# Altium PCB TempMonitorPCB.PcbDoc
Units mm, origin at the board's own origin, x right, y up, seen from the top; angles counter-clockwise.
Board outline 21.08 x 98.31 mm, 2 copper layers (Top Layer, Bottom Layer); 8 components, 9 nets, 45 pads, 2 vias.
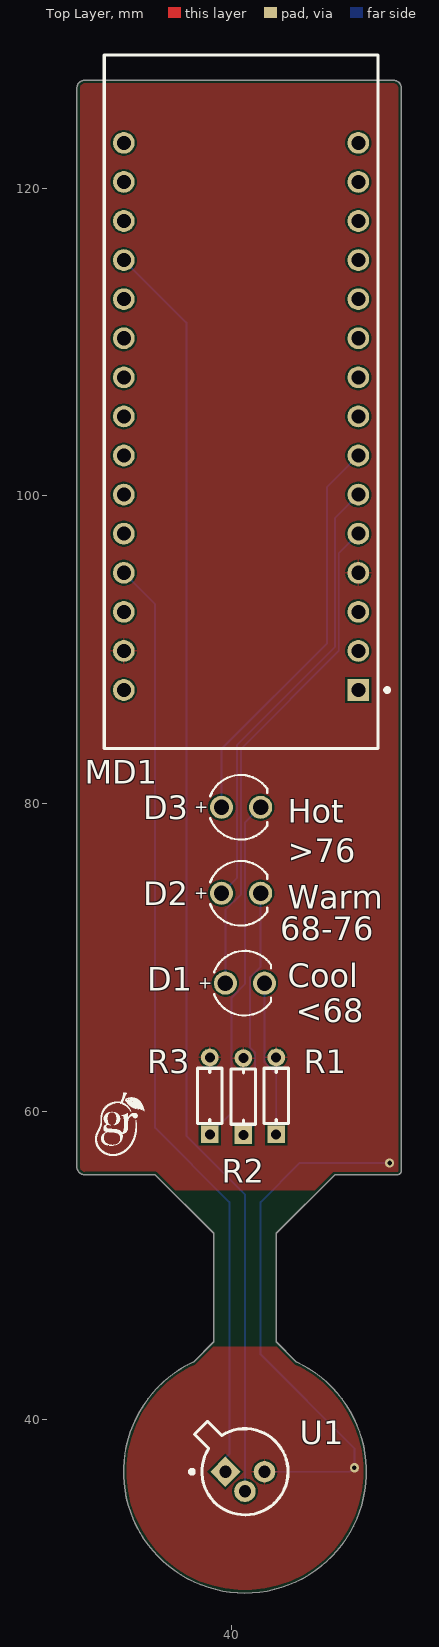
[diagram p0: Top Layer view]
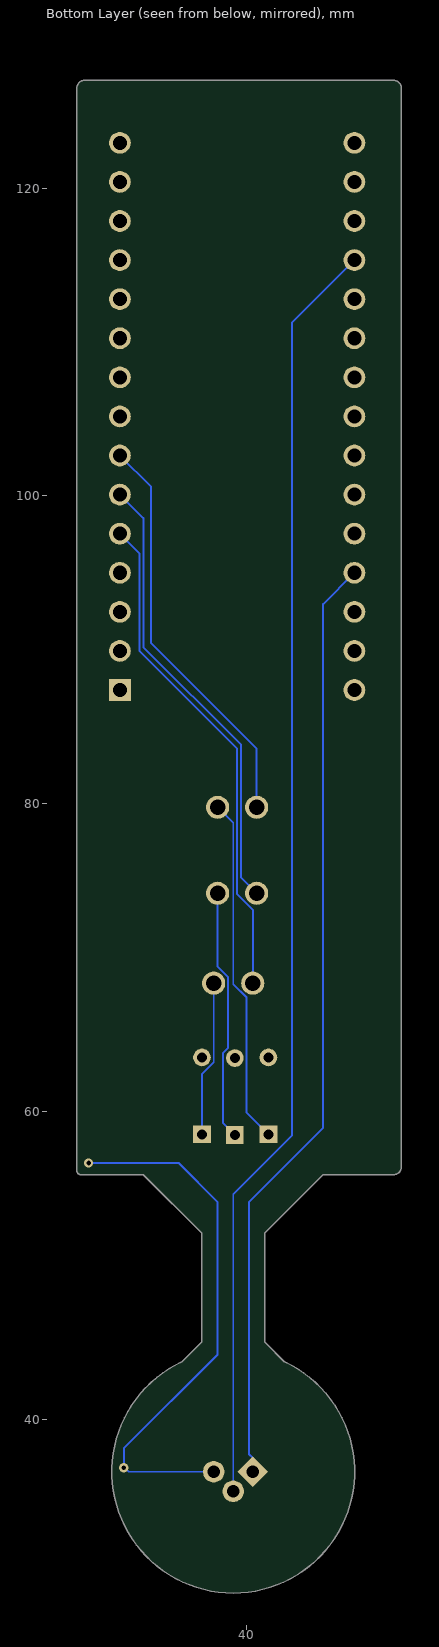
[diagram p1: Bottom Layer view, seen from below]

## Layer stack, top to bottom
Top Solder: solder mask 0.0102, Solder Resist, Dk 3.5
Top Layer: signal copper 0.0356
Dielectric 1: dielectric 0.32, FR-4, Dk 4.8
Bottom Layer: signal copper 0.0356
Bottom Solder: solder mask 0.0102, Solder Resist, Dk 3.5

## Board outline
37.573,43.729 38.802,44.958 38.862,45.018 38.862,52.07 35.052,55.88 30.48,55.88 cw(c30.48,56.388) 29.972,56.388 29.972,126.492 cw(c30.48,126.492) 30.48,127 50.546,127 cw(c50.546,126.492) 51.054,126.492 51.054,56.134 cw(c50.8,56.134) 50.8,55.88 46.736,55.88 42.926,52.07 42.926,45.018 44.215,43.729 cw(c40.894,36.576)

## Design rules (kind name [scope] priority, off if disabled: settings)
BoardOutlineClearance [All] p1: gap=0.2 ignorepadtopadclearanceinfootprint=FALSE
Clearance [All] p1: gap=0.127 ignorepadtopadclearanceinfootprint=FALSE except(0.25: Arc-Hole Track-Hole SMDPad-Hole THPad-Hole Via-Hole Fill-Hole Poly-Hole Region-Hole Text-Hole)
ComponentClearance [All] p1: gap=0.127 collisioncheckmode=3 verticalgap=0.127 showdistances=TRUE
DiffPairsRouting [All] p1: maxlimit=0.254 minlimit=0.127 mostfreqgap=0.127 toplayer_minwidth=0.127 toplayer_maxwidth=25.4 toplayer_prefwidth=0.127 bottomlayer_minwidth=0.127 bottomlayer_maxwidth=25.4 bottomlayer_prefwidth=0.127 maxuncoupledlength=12.7
Height [All] p1: minheight=0 maxheight=1816.048 prefheight=12.7
HoleSize [All] p1: absolutevalues=TRUE maxlimit=6.3 minlimit=0.3 maxpercent=80.000 minpercent=20.000
HoleToHoleClearance [All] p1: gap=0.25 allowstackedmicrovias=FALSE
MinimumAnnularRing [All] p1: minimumring=0.076
MinimumSolderMaskSliver [All] p1: minsoldermaskwidth=0
PlaneClearance [All] p1: clearance=0.127
PlaneConnect PlaneConnectPowerPads [InPadClass('PowerPads')] p1: planeconnectstyle=Direct reliefexpansion=0.508 reliefentries=4 reliefconductorwidth=0.254 reliefairgap=0.254
PlaneConnect [All] p2: pad.planeconnectstyle=Relief pad.reliefexpansion=0.3 pad.reliefentries=4 pad.reliefconductorwidth=0.127 pad.reliefairgap=0.127 via.planeconnectstyle=Direct via.reliefexpansion=0.3 via.reliefentries=4 via.reliefconductorwidth=0.127 via.reliefairgap=0.127
PolygonConnect PolygonConnectPowerPads [All vs (InPadClass('PowerPads'))] p1: connectstyle=Direct reliefconductorwidth=0.254 reliefentries=4 polygonreliefangle="90 Angle" airgapwidth=0.254
PolygonConnect [All] p2: thpad.connectstyle=Relief thpad.reliefconductorwidth=0.127 thpad.reliefentries=4 thpad.polygonreliefangle="90 Angle" thpad.airgapwidth=0.127 smdpad.connectstyle=Relief smdpad.reliefconductorwidth=0.127 smdpad.reliefentries=4 smdpad.polygonreliefangle="90 Angle" smdpad.airgapwidth=0.127 via.connectstyle=Direct via.reliefconductorwidth=0.127 via.reliefentries=4 via.polygonreliefangle="90 Angle" via.airgapwidth=0.127
RoutingVias [All] p1: holewidth=0.3 width=0.6 viastyle="Through Hole" minholewidth=0.3 minwidth=0.6 maxholewidth=0.6 maxwidth=6.6
SilkToSilkClearance [All] p1: silktosilkclearance=0
SilkToSolderMaskClearance [IsPad] p1: minsilkscreentomaskgap=0.127 clearancetoexposedcopper=TRUE
SolderMaskExpansion [All] p1: expansion=0.075 istentingtop=FALSE
SupplyNets "Schematic Supply Nets_1" [InNet('+5V')] p1: voltage=0.000
SupplyNets "Schematic Supply Nets" [InNet('GND')] p2: voltage=0.000
Width [All] p1: maxlimit=25.4 minlimit=0.127 preferedwidth=0.127 minimp=50.000000 maximp=50.000000 favimp=50.000000
20 further rules are at their usual default settings.

## Components (designator, comment, footprint, x,y, rotation, side; value= is the part's Value field where it differs from the comment)
D1 "151031VS06000" WL-TMRC_D3.95H5.3 1310.894,1338.326 r0 top
D2 "151031YS06000" WL-TMRC_D3.95H5.3 1310.64,1344.168 r0 top
D3 "151031SS06000" WL-TMRC_D3.95H5.3 1310.64,1349.756 r0 top
MD1 "A000005" FP-A000005-MFG 40.64,106.108 r180 top
R1 "MBA02040C2200FC100" FP-MBA0204-MFG 42.926,61 r90 top value=220Ω
R2 "MBA02040C2200FC100" FP-MBA0204-MFG 40.789,60.96 r90 top value=220Ω
R3 "MBA02040C2200FC100" FP-MBA0204-MFG 38.608,61 r90 top value=220Ω
U1 "LM34AH" NDV0003A 40.894,36.576 r0 top

## Footprints (in the part's own frame and the unit in brackets; to place one, negate y for a bottom-side part, rotate by r counter-clockwise, add the part's x,y. Pads: shape width x height; smd on the part's side, far side on the other; paste and mask are expansions set on the pad)
FP-A000005-MFG [mil]
  rect 55.67x55.67 hole 35.98 paste-99999 mask+0: 1(-300,737.5)
  round 55.67 hole 35.98 paste-99999 mask+0: 2(-300,637.5) 3(-300,537.5) 4(-300,437.5) 5(-300,337.5) 6(-300,237.5) 7(-300,137.5) 8(-300,37.5) 9(-300,-62.5) 10(-300,-162.5) 11(-300,-262.5) 12(-300,-362.5) 13(-300,-462.5) 14(-300,-562.5) 15(-300,-662.5) 16(300,-662.5) 17(300,-562.5) 18(300,-462.5) 19(300,-362.5) 20(300,-262.5) 21(300,-162.5) 22(300,-62.5) 23(300,37.5) 24(300,137.5) 25(300,237.5) 26(300,337.5) 27(300,437.5) 28(300,537.5) 29(300,637.5) 30(300,737.5)
  silkscreen extent -379,-888 350,888, body extent -354,-891 354,891, height 10
FP-MBA0204-MFG [mm]
  rect 1.15x1.15 hole 0.65 paste-2539.97 mask+0: 1(-2.5,0)
  round 1.15 hole 0.65 paste-2539.97 mask+0: 2(2.5,0)
  silkscreen extent -1.8,-0.8 1.8,0.8, body extent -3.17,-0.9 3.17,0.9, height 0.25
NDV0003A [mm] "Can; 3 Leads; Pin Circle Dia. 2.54 mm; Lead Dia. 0.48 mm (max)"
  rect 1.4x1.4 hole 0.8 rot 45: 1(-1.27,0)
  round 1.4 hole 0.8: 2(0,-1.27) 3(1.27,0)
  silkscreen extent -3.57,-2.8 2.8,3.28, body extent -2.8,-2.8 2.8,2.8, height 2.67
WL-TMRC_D3.95H5.3 [mm] "THT Mono-color Round Color LED, 2-leads"
  round 1.5 hole 1: 1(-1271.27,-1270) 2(-1268.73,-1270)
  silkscreen extent -1272,-1272.1 -1268.31,-1267.9, body extent -1271.99,-1271.97 -1268.37,-1268.03, height 5.35

## Part data
D1: library part CMP-1488-00004-3, "Led, Green, T-1 (3Mm), 568 Nm, 2.2 V, 30 Ma, 20 Mcd Rohs Compliant: Yes", Case/Package=Radial, Color=Green, Forward Current=100mA, Forward Voltage=2.2V, Manufacturer Lifecycle Status=ACTIVE, Max Operating Temperature=85°C, Max Reverse Voltage (DC)=5V, Min Operating Temperature=-40°C, Test Current=20mA, Dominant Wavelength=568nm, Height=5.3mm, Lead Free="Lead Free", Length=3mm, Lens Size=3mm, Lens Style="Circular, Diffused, Round", Lifecycle Status=Production, Luminous Intensity=30mcd, Mount="Through Hole", Packaging=Bulk, Peak Wavelength=560nm, REACH SVHC=Unknown, RoHS=Compliant, Viewing Angle=60°, Wavelength=568nm, Width=3mm, YEOL="1 = Estimated lifetime > 10 years"
D2: library part CMP-1488-00006-3, "Wurth Elektronik LED, WL-TMRC, 3mm (T-1), 590 nm, 3 (Dia.) x 5.3mm", Case/Package=Radial, Color=Yellow, Forward Current=100mA, Forward Voltage=2V, Manufacturer Lifecycle Status=ACTIVE, Max Operating Temperature=85°C, Max Reverse Voltage (DC)=5V, Min Operating Temperature=-40°C, Test Current=20mA, Dominant Wavelength=590nm, Height=5.3mm, Length=3mm, Lens Size=3mm, Lens Style="Circular, Diffused, Round", Lifecycle Status=Production, Luminous Intensity=110mcd, Mount="Through Hole", Packaging=Bulk, Peak Wavelength=592nm, REACH SVHC=Unknown, RoHS=Compliant, Viewing Angle=60°, Wavelength=590nm, Width=3mm, YEOL="1 = Estimated lifetime > 10 years"
D3: library part CMP-1488-00002-3, "Wurth Elektronik LED, WL-TMRC, 3mm (T-1), 640 nm, 3 (Dia.) x 5.3 Lmm", Case/Package=Radial, Color=Red, Forward Current=100mA, Forward Voltage=2.2V, Manufacturer Lifecycle Status=ACTIVE, Max Operating Temperature=85°C, Max Reverse Voltage (DC)=5V, Min Operating Temperature=-40°C, Test Current=20mA, Dominant Wavelength=640nm, Height=5.3mm, Length=3mm, Lens Size=3mm, Lens Style="Circular, Diffused, Round", Lifecycle Status=Production, Luminous Intensity=35mcd, Mount="Through Hole", Packaging=Bulk, Peak Wavelength=650nm, REACH SVHC=Unknown, RoHS=Compliant, Viewing Angle=60°, Wavelength=630nm, Width=3mm, YEOL="1 = Estimated lifetime > 10 years"
MD1: library part CMP-189986-000002-1, "ARDUINO NANO ATMEGA328 EVAL BRD", Operating Supply Voltage=12V, Package Quantity=50, Core Architecture=AVR, Data Bus Width=8b, Evaluation Kit=Yes, Height=0.25inch, Interface=I2C, Length=7inch, Number of Bits=8, Packaging=Bulk, REACH SVHC="No SVHC", Series="AVR® ATmega", Weight=0.358383oz, Width=5inch
R1 R2 R3: library part CMP-02408-000005-1, "RES 220 OHM 0.4W 1% AXIAL", Manufacturer="Vishay BC Components", Package=MBA0204, Power Rating=0.25W, Resistance=220Ω, Temperature="-55°C to +125°C", Temperature Coefficient=50ppm/°C, Temperature Range High=+125°C, Temperature Range Low=-55°C, Tolerance=1%, Voltage Rating=200V, Automotive=Yes, Automotive Grade="Grade 1", Category=Res, ComponentLink2Description=Datasheet, ComponentLink2URL=http://www.vishay.com/docs/28766/mbxsma.pdf, Composition="Metal Film", Device Class L1="Passive Components", Device Class L2=Resistors, Device Class L3="Through-Hole Resistors", Digikey Description="RES 220 OHM 0.4W 1% AXIAL", Height=1.6mm, Ipc Land Pattern Name=RESAD500W65L360D160, Lead Free=Yes, Manufacturer Part Number=MBA02040C2200FC100, Mouser Description="Thin Film Resistors - Through Hole .4watt 220ohms 1% 1/8watt body size", Octopart=https://octopart.com/mba02040c2200fc100-vishay-43743094, RoHS=TRUE, Series="MBA/SMA 0204"
U1: library part CMP-0066-00003-3, "Precision Fahrenheit Temperature Sensor, 3-pin TO-46", Manufacturer="Texas Instruments", PackageTopMarking="NSXYTTE# LM34AH", PowerWise=N, Code_JEDEC=TO-46, ComponentLink1Description="Datasheet URL", ComponentLink1URL=http://www.ti.com/general/docs/lit/getliterature.tsp?genericPartNumber=LM34&fileType=pdf, CompType="Temp Sensor IC", PackageDescription="Metal Can, TO-46, 3 Lead, .100in Dia, P.C.", PackageReference=NDV0003A, PinCount=3, RoHS=N

## Via types
v1: diameter 0.6, hole 0.3, Top Layer to Bottom Layer, 2 vias

## Nets (pads, with @x,y where several pads share a name; then routed paths per layer and width w, separated by ;. In a path a pad name is that pad's centre, name@x,y a point inside that pad or via, vN(x,y) a via of type N, cw(c..) or ccw(c..) an arc to the next point about the centre after c; other vN are vias at no path point)
+5V: MD1.27 U1.1 | length 61.4
  Bottom Layer w0.127: MD1.27 35.052,92.964 35.052,58.928 39.878,54.102 39.878,37.73 39.624,37.476 U1.1
A0: MD1.19 U1.2 | length 83.3
  Bottom Layer w0.127: MD1.19 37.084,111.252 37.084,58.42 40.894,54.61 U1.2
GND: MD1.4 MD1.29 R1.2 R2.2 R3.2 U1.3 | length 35.2
  Bottom Layer w0.127: U1.3 47.695,36.576 47.949,36.83 v1(48.006,36.83) 48.006,38.1 41.91,44.196 41.91,54.102 44.45,56.642 v1(50.292,56.642)
LED1: D1.1 MD1.5 | length 32.8
  Bottom Layer w0.127: D1.1 39.624,73.092 40.64,74.108 40.64,83.566 46.99,89.916 46.99,96.266 MD1.5
LED2: D2.1 MD1.6 | length 29.6
  Bottom Layer w0.127: D2.1 40.386,75.184 40.386,83.82 46.736,90.17 46.736,98.552 MD1.6
LED3: D3.1 MD1.7 | length 26.5
  Bottom Layer w0.127: D3.1 39.37,83.566 46.228,90.424 46.228,100.584 MD1.7
NetD1_2: D1.2 R1.1 | length 10.1
  Bottom Layer w0.127: D1.2 42.16,68.322 42.16,63.183 42.926,62.417 R1.1
NetD2_2: D2.2 R2.1 | length 16.4
  Bottom Layer w0.127: R2.1 41.555,59.226 41.555,63.805 41.223,64.136 41.223,68.716 41.91,69.402 D2.2
NetD3_2: D3.2 R3.1 | length 22.6
  Bottom Layer w0.127: R3.1 40.024,59.916 40.024,67.396 40.894,68.266 40.894,78.74 D3.2
pads on no net: MD1.1 MD1.2 MD1.3 MD1.8 MD1.9 MD1.10 MD1.11 MD1.12 MD1.13 MD1.14 MD1.15 MD1.16 MD1.17 MD1.18 MD1.20 MD1.21 MD1.22 MD1.23 MD1.24 MD1.25 MD1.26 MD1.28 MD1.30

## Polygon pours and split planes (outlines as drawn)
GND on Top Layer "GND_L01_P002" (solid, remove dead copper, pour order 2): 29.464,128.27 29.718,128.016 51.816,128.016 51.816,54.864 29.094,54.864
GND on Top Layer "GND_L01_P003" (solid, remove dead copper, pour order 3): 30.734,44.704 50.038,44.704 51.816,42.926 50.292,41.402 50.292,27.94 30.48,27.94 30.734,28.194

## Silkscreen, mask and mechanical layers (free items; w line width, h text height)
Top Overlay:
  drawing of 4 lines, arcs and shapes, not listed
  text "Hot" at 43.688,78.74 h1.52
  text ">76" at 43.688,76.2 h1.52
  text "Warm" at 43.688,73.152 h1.52
  text "68-76" at 43.18,71.12 h1.52
  text "Cool" at 43.688,68.072 h1.52
  text "<68" at 44.196,65.786 h1.52
Mechanical 1:
  lines w0.254: 29.972,56.388 ccw(c30.48,56.388) 30.48,55.88 35.052,55.88 38.862,52.07 38.862,45.018 38.802,44.958 37.573,43.729 ccw(c40.894,36.576) 44.215,43.729 42.986,44.958 42.926,45.018 42.926,52.07 46.736,55.88 50.8,55.88 ccw(c50.8,56.134) 51.054,56.134 51.054,126.492 ccw(c50.546,126.492) 50.546,127 30.48,127 ccw(c30.48,126.492) 29.972,126.492 29.972,56.388

## Text inside footprints (layer, text, board x,y; h text height)
D1: Top Overlay "+" at 37.844,67.976 h0.8
D2: Top Overlay "+" at 37.59,73.818 h0.8
D3: Top Overlay "+" at 37.59,79.406 h0.8